# Altium PCB IoT-Button-PCB-v1.3.PcbDoc (part 1 of 2)
Units mil, origin at the board's own origin, x right, y up, seen from the top; angles counter-clockwise.
Board outline 3543.3 x 3267.72 mil, 2 copper layers (Top Layer, Bottom Layer), stack 61.811 mil thick; 61 components, 28 nets, 224 pads, 60 vias.
Unrouted connection lines stored in the file: 71.
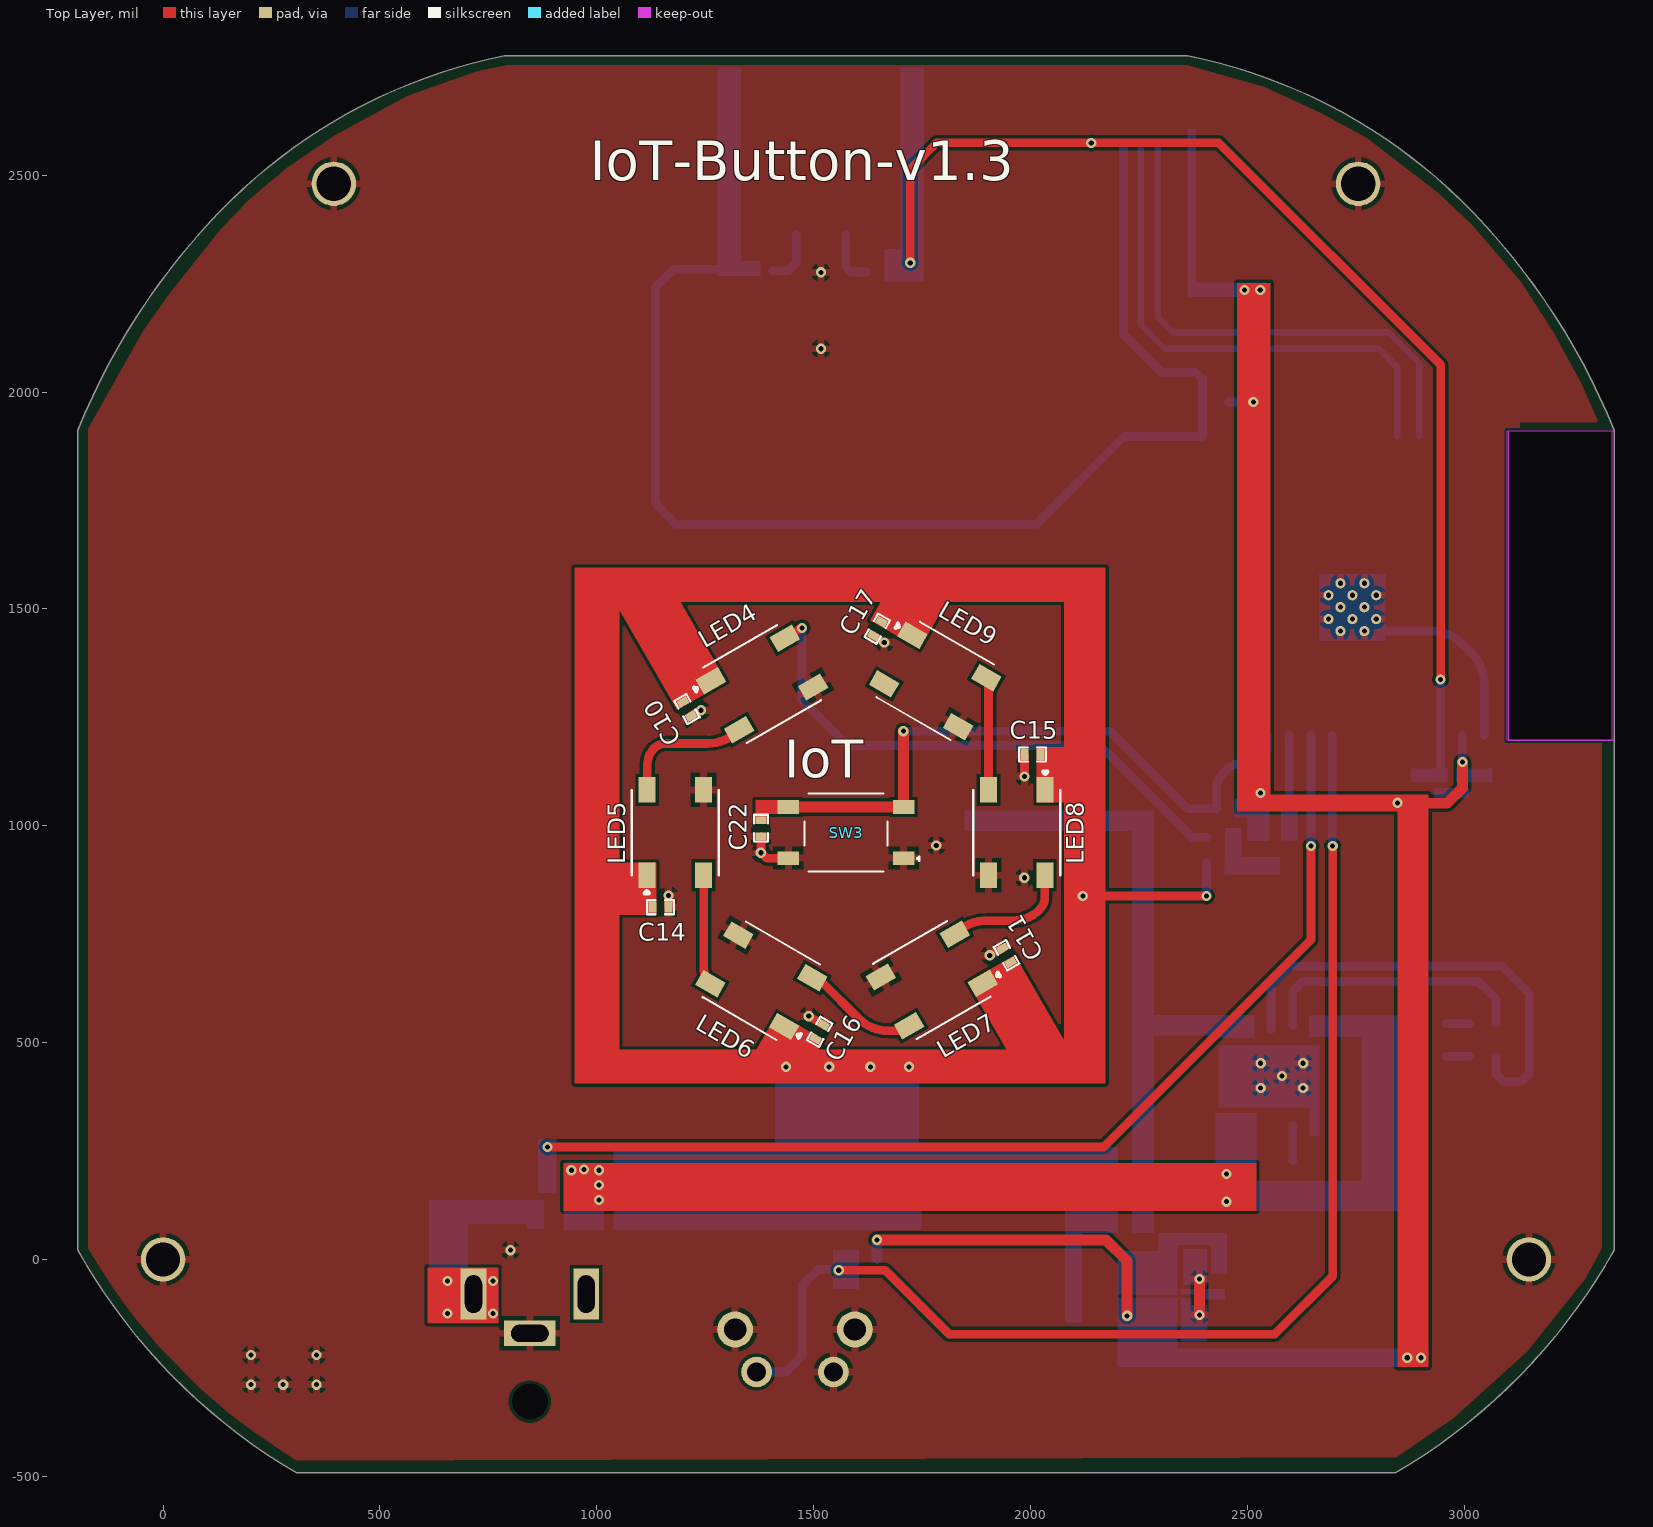
[diagram p0: Top Layer view]
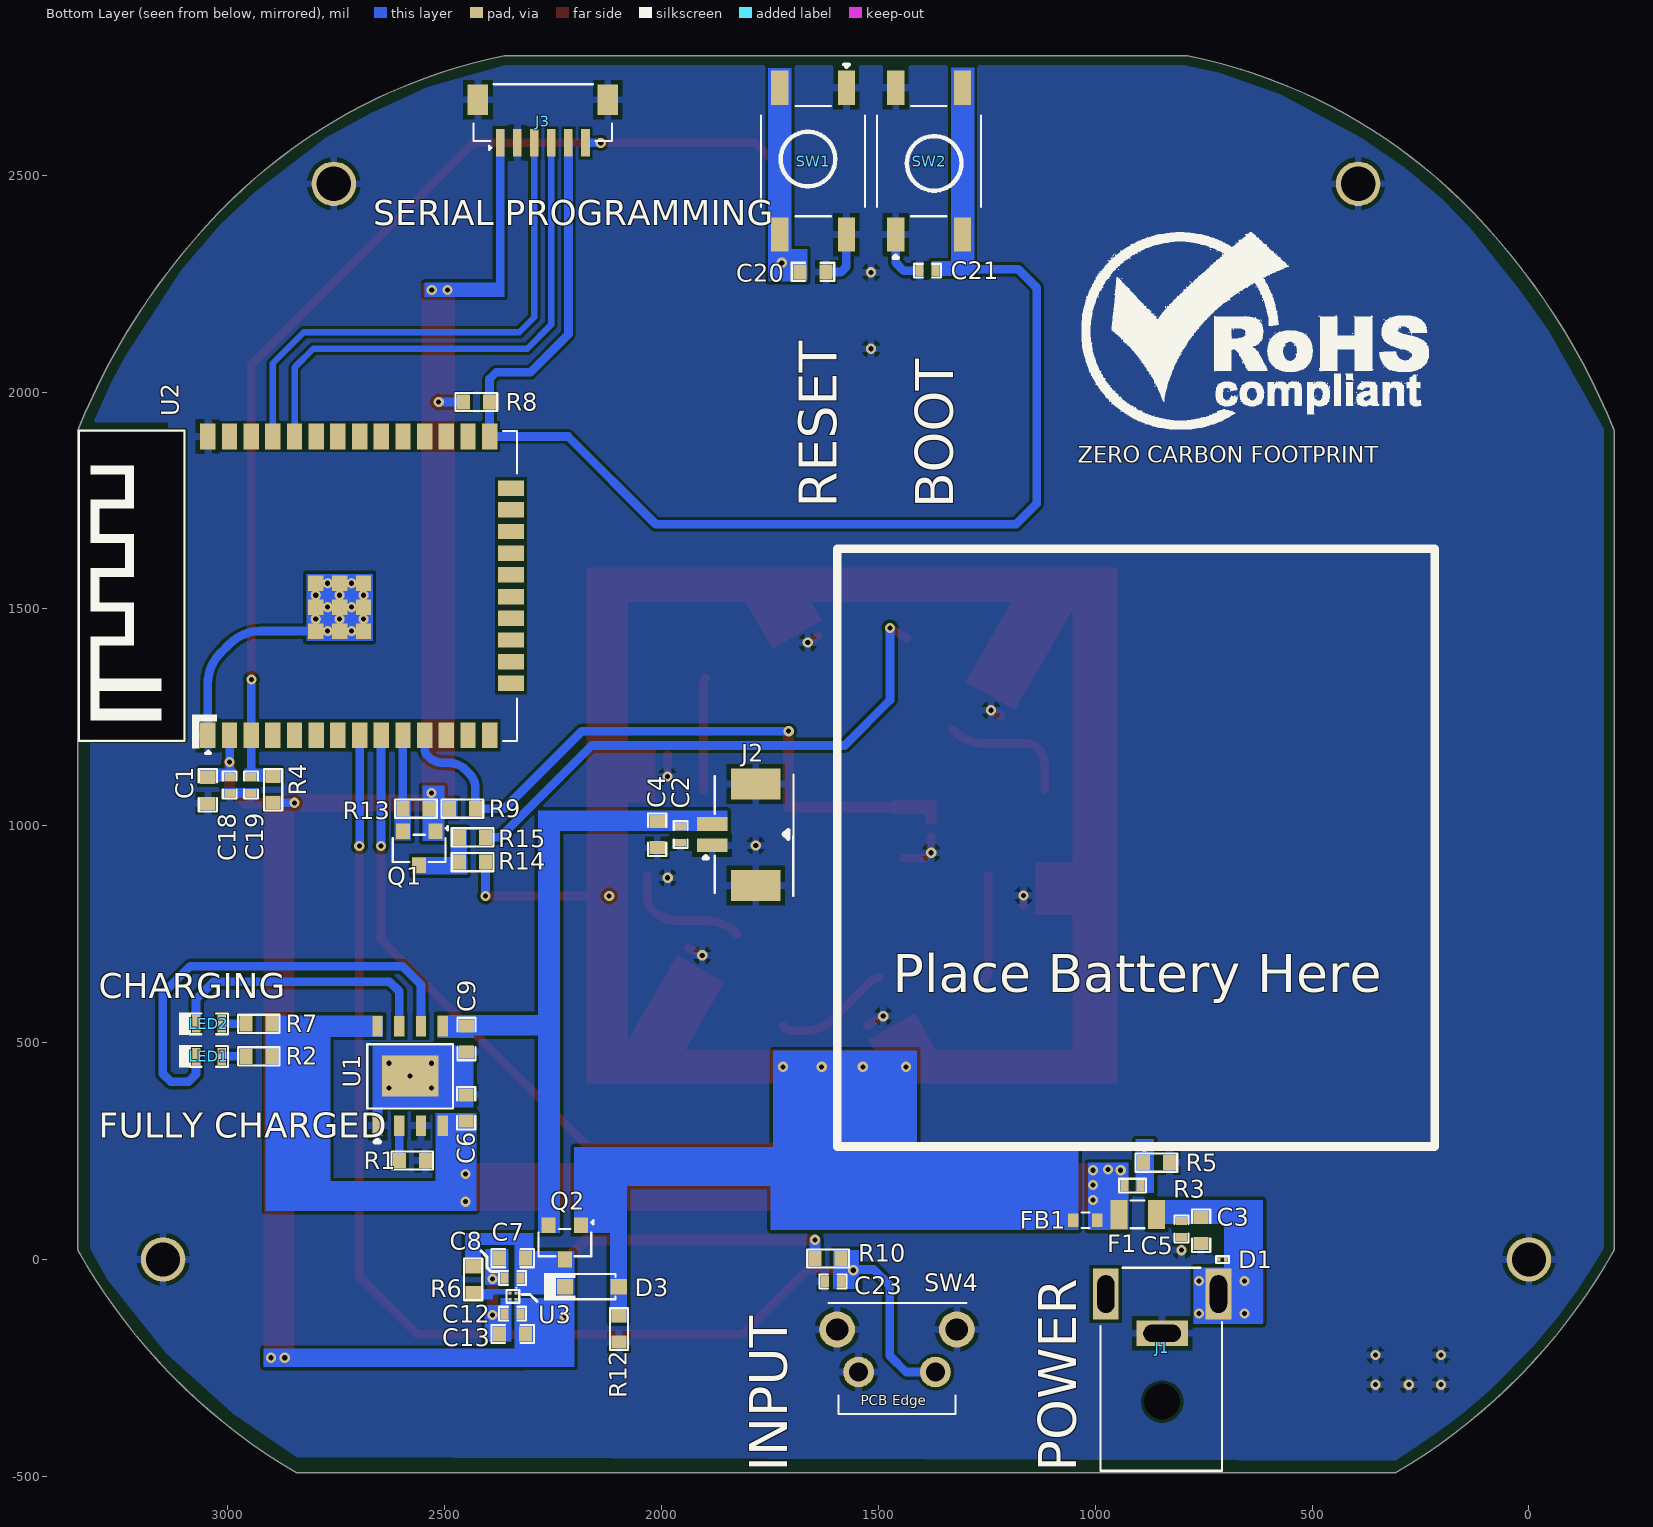
[diagram p1: Bottom Layer view, seen from below]
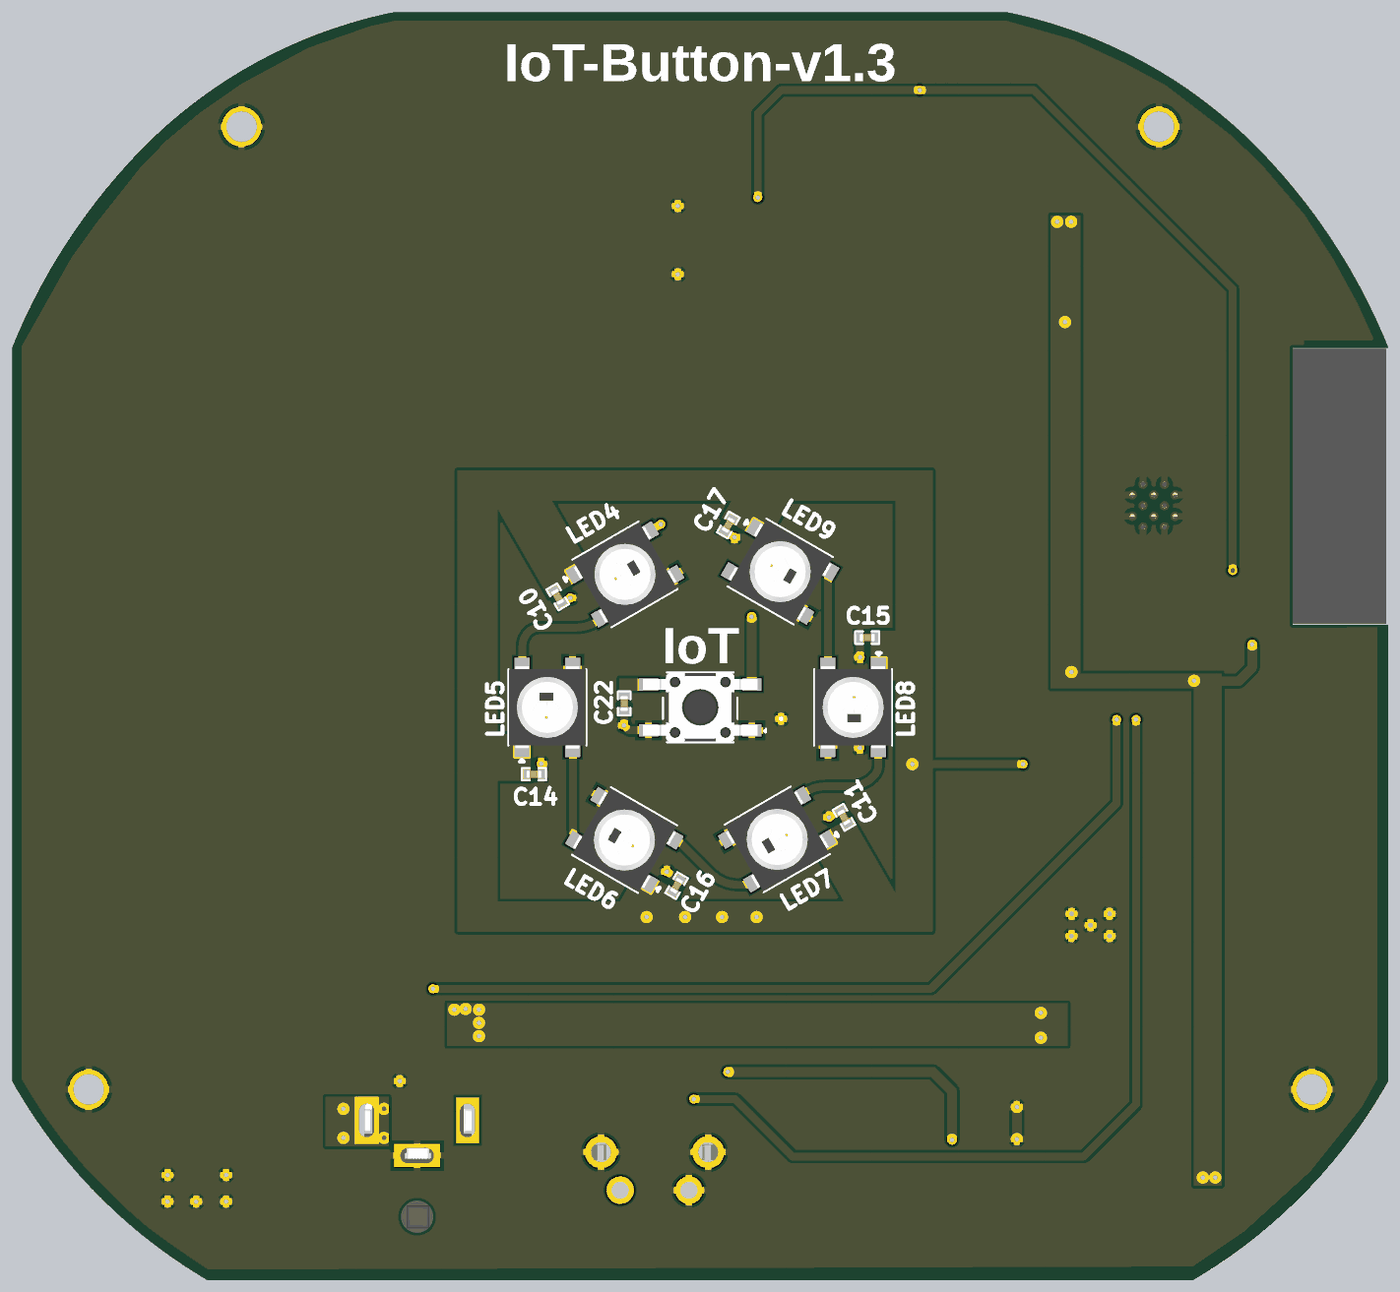
[diagram p2: 3D render of the assembled board from above, using the file's embedded part models]
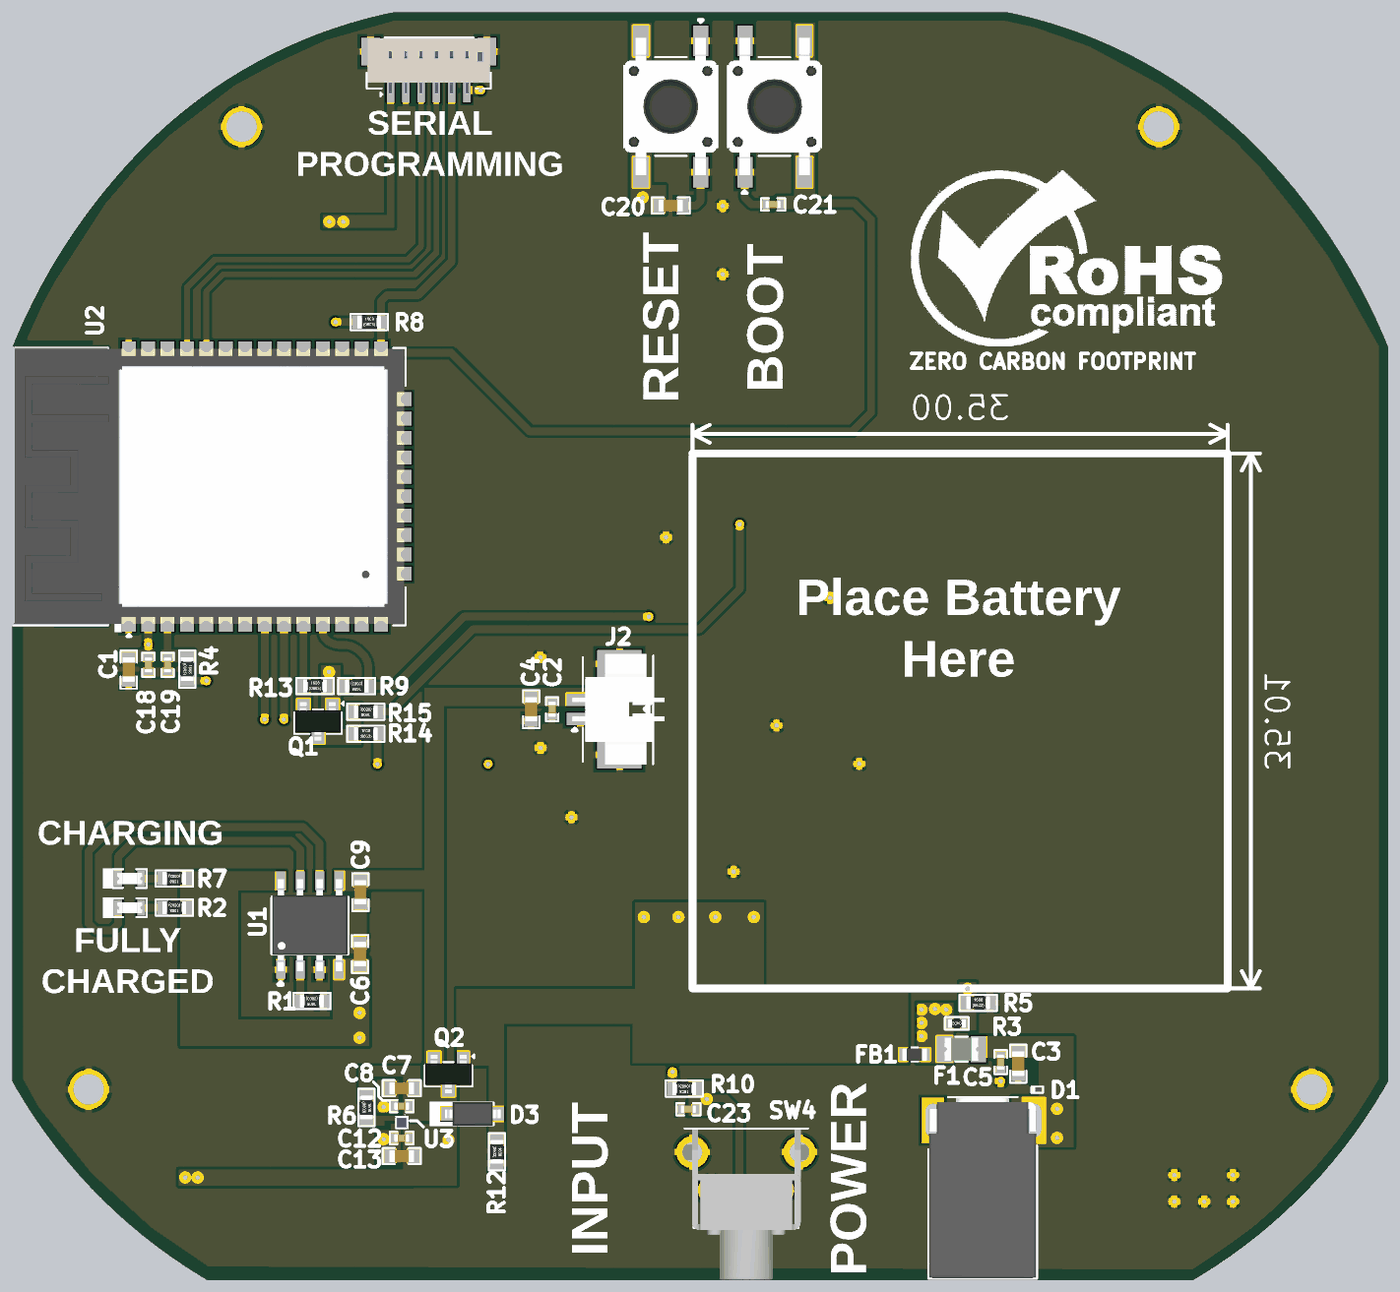
[diagram p3: 3D render of the assembled board from below, using the file's embedded part models]

## Layer stack, top to bottom
Top Solder: solder mask 0.3937, Solder Resist, Dk 3.5
Top Layer: signal copper 1.378
Dielectric 1: dielectric 59.0551, FR-4, Dk 4.8
Bottom Layer: signal copper 1.378
Bottom Solder: solder mask 0.3937, Solder Resist, Dk 3.5

## Board outline
307.28,-492.13 cw(c1004.42,696.47) -196.85,21.41 -196.85,1911.17 cw(c1263.78,1322.48) 127.96,2413.3 cw(c1036.62,1540.64) 787.4,2775.59 2362.2,2775.59 cw(c2112.99,1540.64) 3021.65,2413.3 cw(c1885.82,1322.48) 3346.45,1911.17 3346.46,21.41 cw(c2145.19,696.47) 2842.32,-492.13
cut-out: 3100,1196.74 3100,1910.74 3346.46,1911.17 3346.46,1197.27

## Design rules (kind name [scope] priority, off if disabled: settings)
Clearance [All] p1: gap=7 ignorepadtopadclearanceinfootprint=FALSE
HoleToHoleClearance [All] p1: gap=5 allowstackedmicrovias=TRUE
MinimumSolderMaskSliver [All] p1: minsoldermaskwidth=0
PolygonConnect [All] p1: connectstyle=Relief reliefconductorwidth=17 reliefentries=4 polygonreliefangle="90 Angle" airgapwidth=10
RoutingVias [All] p1: holewidth=11.81 width=23.62 viastyle="Through Hole" minholewidth=11.81 minwidth=23.62 maxholewidth=11.81 maxwidth=23.62
SilkToSilkClearance [All] p1: silktosilkclearance=2
SilkToSolderMaskClearance [IsPad] p1: minsilkscreentomaskgap=0 clearancetoexposedcopper=TRUE
SolderMaskExpansion [All] p1: expansion=4 istentingtop=FALSE
UnRoutedNet [All] p1: checkbadconnections=TRUE
Width [All] p1: maxlimit=47.24 minlimit=10 preferedwidth=20 minimp=50.000000 maximp=50.000000 favimp=50.000000
25 further rules are at their usual default settings.

## Classes and differential pairs
component class U_Power-Section: C2 C3 C4 C5 C6 C7 C8 C9 C12 C13 D1 D3 F1 FB1 J1 J2 LED1 LED2 Q2 R1 R2 R3 R5 R6 R7 R12 U1 U3
component class U_LEDS: C10 C11 C14 C15 C16 C17 LED4 LED5 LED6 LED7 LED8 LED9 Q1 R13 R14 R15
component class U_Controller-Section: C1 C18 C19 C20 C21 C22 C23 J3 R4 R8 R9 R10 SW1 SW2 SW3 SW4 U2

## Components (designator, comment, footprint, x,y, rotation, side; value= is the part's Value field where it differs from the comment)
C1 "1uF" Cap-0603 3046.46,1081.75 r90 bottom locked
C2 "100nF" Cap-0402 1956.15,979.25 r90 bottom locked
C3 "1uF" Cap-0603 755.95,66.25 r90 bottom
C4 "1uF" Cap-0603 2010.15,979.25 r90 bottom locked
C5 "100nF" Cap-0402 801,70.21 r90 bottom
C6 "10uF" Cap-0603 2450.85,348.62 r270 bottom locked
C7 "1uF" Cap-0603 2343.61,2.88 r180 bottom
C8 "100nF" Cap-0402 2343.61,-43 r180 bottom
C9 "10uF" Cap-0603 2450,508 r90 bottom locked
C10 "100nF" Cap-0402 1208,1269.02 r120 top
C11 "100nF" Cap-0402 1945,701 r300 top
C12 "100nF" Cap-0402 2343.61,-125.3 r180 bottom
C13 "1uF" Cap-0603 2343.61,-172 r180 bottom
C14 "100nF" Cap-0402 1146.83,812 r180 top locked
C15 "100nF" Cap-0402 2004.96,1164 r0 top
C16 "100nF" Cap-0402 1514,524.98 r240 top
C17 "100nF" Cap-0402 1647.14,1454.18 r60 top
C18 "100nF" Cap-0402 2996,1094 r90 bottom locked
C19 "100nF" Cap-0402 2946.46,1094 r90 bottom
C20 "1uF" Cap-0603 1651,2277 r180 bottom
C21 "100nF" Cap-0402 1387,2280 r180 bottom
C22 "100nF" Cap-0402 1378.94,994.25 r90 top
C23 "100nF" Cap-0402 1605,-51 r180 bottom
D1 "PESD5V0H1BSFYL" DSN0603-2 706.95,-0.75 r180 bottom locked
D3 "MBR120VLSFT3G" SOD-123 2160.66,-63.07 r0 bottom
F1 "BSMD0805L-200" Fuse-0805 902.11,103.68 r0 bottom locked
FB1 "BLM18SG121TN1D" "IND-0603 (1608 Metric)" 1023,90 r180 bottom
J1 "DC-0360-2.5" DC-0360-2.5 845.7,-170.52 r90 bottom locked
J2 "1.25-2PWB" 1.25-2PWB 1833.15,979.25 r90 bottom locked
J3 "Voltlink Target" "Voltlink Target" 2273.95,2624.25 r180 bottom locked
LED1 "DNP" LED-0603 3044,468 r0 bottom locked
LED2 "RED" LED-0603 3044,543.25 r0 bottom locked
LED4 "WS2812B-XF02/W" WS2812B-XF02/W 1381.02,1326.96 r30 top
LED5 "WS2812B-XF02/W" WS2812B-XF02/W 1181.1,984.25 r90 top locked
LED6 "WS2812B-XF02/W" WS2812B-XF02/W 1379.57,642.37 r150 top
LED7 "WS2812B-XF02/W" WS2812B-XF02/W 1772.94,644.04 r210 top
LED8 "WS2812B-XF02/W" WS2812B-XF02/W 1968.5,984.25 r270 top locked
LED9 "WS2812B-XF02/W" WS2812B-XF02/W 1780.59,1333.95 r330 top
Q1 "Si2302CDS" Sot-23 2559.12,948.13 r0 bottom
Q2 "AO3401" SOT-23 2223.15,39.25 r0 bottom locked
R1 "10K" Res-0603 2574.95,227.95 r180 bottom locked
R2 "DNP" Res-0603 2928.95,468.25 r180 bottom locked
R3 "56k" Res-0402 914,170 r0 bottom value=56kR
R4 "10K" Res-0603 2896,1083 r90 bottom
R5 "100K" Res-0603 859,223 r0 bottom
R6 "10K" Res-0603 2434.5,-46.36 r90 bottom
R7 "330R" Res-0603 2928.95,543.25 r180 bottom locked
R8 "DNP" Res-0603 2427,1977 r0 bottom
R9 "10K" Res-0603 2459.47,1039.25 r180 bottom
R10 "10K" Res-0603 1616,2 r180 bottom locked
R12 "100K" RES-0603 2098.15,-160.75 r90 bottom locked
R13 "10K" Res-0603 2566.72,1039.5 r0 bottom
R14 "10K" Res-0603 2436,916 r0 bottom
R15 "1K" Res-0603 2436,973 r180 bottom
SW1 "K2-6639SP-C4SC-04" K2-6639SP-C4SC-04 1650.77,2532.29 r270 bottom locked
SW2 "K2-6639SP-C4SC-04" K2-6639SP-C4SC-04 1383.23,2532.29 r90 bottom locked
SW3 "GT-TC074E-H080-L1" GT-TC074E-H080-L1 1574.8,984.25 r180 top locked
SW4 "1825027-8" 1825027-8 1457.2,-210.75 r180 bottom locked
U1 "TP4056-42-ESOP8" ESOP-8 2579.95,423.05 r90 bottom locked
U2 "ESP32-WROOM-32E-N8R2" "38-SMD Module" 2696.85,1553.15 r90 bottom locked
U3 "TPS7A2133PYWDJ" "4-WCSP (0.63x0.63)" 2343.61,-85.79 r270 bottom

## Footprints (in the part's own frame and the unit in brackets; to place one, negate y for a bottom-side part, rotate by r counter-clockwise, add the part's x,y. Pads: shape width x height; smd on the part's side, far side on the other; paste and mask are expansions set on the pad)
1.25-2PWB [mm]
  rect 0.8x1.8 smd: 1(-0.625,1.275) 2(0.625,1.275)
  rect 1.8x2.9 smd: MP1(-2.975,-1.275) MP2(2.975,-1.275)
  silkscreen extent -3.6,-3.48 3.52,1.78, body extent -3.62,-4.24 3.62,1.81, height 3.5
"4-WCSP (0.63x0.63)" [mm]
  rect 0.165x0.165 smd: A1(-0.192,0.193) A2(0.158,0.193) B1(-0.192,-0.157) B2(0.158,-0.157)
  silkscreen extent -0.54,-0.37 0.36,0.39, body extent -0.32,-0.32 0.32,0.32, height 0.43
"38-SMD Module" [mm]
  rect 1.5x0.9 smd: 1(-8.75,8.88) 2(-8.75,7.61) 3(-8.75,6.34) 4(-8.75,5.07) 5(-8.75,3.8) 6(-8.75,2.53) 7(-8.75,1.26) 8(-8.75,-0.01) 9(-8.75,-1.28) 10(-8.75,-2.55) 11(-8.75,-3.82) 12(-8.75,-5.09) 13(-8.75,-6.36) 14(-8.75,-7.63) 25(8.75,-7.63) 26(8.75,-6.36) 27(8.75,-5.09) 28(8.75,-3.82) 29(8.75,-2.55) 30(8.75,-1.28) 31(8.75,-0.01) 32(8.75,1.26) 33(8.75,2.53) 34(8.75,3.8) 35(8.75,5.07) 36(8.75,6.34) 37(8.75,7.61) 38(8.75,8.88)
  rect 0.9x1.5 smd: 15(-5.71,-8.88) 16(-4.44,-8.88) 17(-3.17,-8.88) 18(-1.9,-8.88) 19(-0.63,-8.88) 20(0.64,-8.88) 21(1.91,-8.88) 22(3.18,-8.88) 23(4.45,-8.88) 24(5.72,-8.88)
  rect 0.9x0.9 smd: 39(-2.65,2.56) 40(-1.25,2.56) 41(0.15,2.56) 42(-2.65,1.16) 43(-1.25,1.16) 44(0.15,1.16) 45(-2.65,-0.24) 46(-1.25,-0.24) 47(0.15,-0.24)
  round 0.6 hole 0.3 mask+0: 39_10(-1.95,2.56) 39_11(-0.55,2.56) 39_12(-2.65,1.86) 39_13(-1.25,1.86) 39_14(0.15,1.86) 39_15(-1.95,1.16) 39_16(-0.55,1.16) 39_17(-2.65,0.46) 39_18(-1.25,0.46) 39_19(0.15,0.46) 39_20(-1.95,-0.24) 39_21(-0.55,-0.24)
  Keep-Out Layer region: -9.043,16.383 9.042,16.383 9.042,10.287 -9.043,10.287
  silkscreen extent -9.8,-9.22 9.09,16.43, body extent -9,-9.12 9,16.38, height 3.25
1825027-8 [mm]
  round 1.8 hole 1.1: 1(-2.25,-1.245) 2(2.25,-1.245)
  round 2.1 hole 1.3: 3(3.505,1.245) 4(-3.505,1.245)
  silkscreen extent -4.01,-3.71 4.06,2.79, body extent -4.18,-7.11 4.23,2.73, height 8
Cap-0402 [mil]
  rect 18x25 smd mask+2.36: 1(-18.5,0) 2(18.5,0)
  silkscreen extent -31,-16 31,16, body extent -20,-10 20,10, height 19
Cap-0603 [mil]
  rect 30x35 smd mask+2.36: 1(-30,0) 2(30,0)
  silkscreen extent -49,-21 49,21, body extent -32,-16 31,16, height 34
DC-0360-2.5 [mm]
  rect 1.5x3 hole 1 slot 2.2 at 90 deg mask+0.05: 2(0,0)
  rect 3x1.5 hole 1 slot 2.2 at 0 deg mask+0.05: 3(2.3,3.3) 4(2.3,-3.3)
  round 0 hole 2.1 unplated mask+0.05: MH(-4,0)
  silkscreen extent -8.05,-3.51 3.84,3.61, body extent -8.01,-3.45 3.79,3.56, height 9.65
DSN0603-2 [mm]
  rect 0.2x0.24 smd mask+0.055: 1(-0.2,0) 2(0.2,0)
  silkscreen extent -0.38,-0.2 0.38,0.2, body extent -0.3,-0.15 0.3,0.15, height 0.32
ESOP-8 [mm]
  rect 1.2x0.6 smd: 1(-2.909,1.905) 2(-2.909,0.635) 3(-2.909,-0.635) 4(-2.909,-1.905) 5(2.909,-1.905) 6(2.909,-0.635) 7(2.909,0.635) 8(2.909,1.905)
  rect 2.4x3.3 smd: 9(0,0)
  silkscreen extent -3.88,-2.51 1.85,2.51, body extent -3,-2.45 3,2.45, height 1.75
Fuse-0805 [mm]
  rect 1x1.7 smd: 1(-1.1,0) 2(1.1,0)
  silkscreen extent -0.41,-0.81 0.41,0.81, body extent -1.1,-0.75 1.1,0.75, height 1.24
GT-TC074E-H080-L1 [mm]
  rect 1.25x0.8 smd: 1(-3.375,1.5) 2(3.375,1.5) 3(-3.375,-1.5) 4(3.375,-1.5)
  silkscreen extent -4.29,-2.29 2.44,2.29, body extent -3.75,-2.25 3.75,2.25, height 8
"IND-0603 (1608 Metric)" [mm] "0.063\" L x 0.032\" W (1.60mm x 0.80mm)"
  rect 0.6x0.8 smd: 1(-0.7,0) 2(0.7,0)
  silkscreen extent -0.2,-0.46 0.23,0.46, body extent -0.8,-0.4 0.8,0.4, height 0.78
K2-6639SP-C4SC-04 [mm]
  rect 2x1 smd: 1(-4.3,1.95) 2(4.3,1.95) 3(-4.3,-1.95) 4(4.3,-1.95)
  silkscreen extent -5.66,-3.05 3.23,3.05, body extent -4.5,-3 4.5,3, height 5
LED-0603 [mm]
  rect 0.5x1 smd: 1(-0.75,0) 2(0.75,0)
  silkscreen extent -1.12,-0.66 1.75,0.66, body extent -0.82,-0.37 0.82,0.36, height 0.68
Res-0402 [mil]
  rect 18x25 smd mask+2.17: 1(-18.5,0) 2(18.5,0)
  silkscreen extent -32,-17 32,16, body extent -23,-11 23,11, height 16
Res-0603 [mil]
  rect 30x35 smd: 1(-30,0) 2(30,0)
  silkscreen extent -48,-21 48,21, body extent -31,-17 31,17, height 18
RES-0603 [mil]
  rect 30x35 smd: 1(-30,0) 2(30,0)
  silkscreen extent -48,-21 48,21, body extent -31,-17 31,17, height 18
SOD-123 [mm]
  rect 0.95x0.9 smd: 1(-1.575,0) 2(1.575,0)
  silkscreen extent -1.37,-0.8 2.82,0.8, body extent -1.82,-0.77 1.83,0.78, height 1.5
Sot-23 [mm] "TRANS NPN 40V 0.6A SOT23"
  rect 0.82x0.92 smd: 1(-0.95,-1) 2(0.95,-1) 3(0,1)
  silkscreen extent -1.68,-1.3 1.55,0.81, body extent -1.5,-1.25 1.5,1.25, height 1.05
SOT-23 [mm] "TRANS NPN 40V 0.6A SOT23"
  rect 0.82x0.92 smd: 1(-0.95,-1) 2(0.95,-1) 3(0,1)
  silkscreen extent -1.68,-1.3 1.55,0.81, body extent -1.5,-1.25 1.5,1.25, height 1.05
"Voltlink Target" [mm]
  rect 0.5x1.6 smd: 1(-2.5,-1.262) 2(-1.5,-1.262) 3(-0.5,-1.262) 4(0.5,-1.262) 5(1.5,-1.262) 6(2.5,-1.262)
  rect 1.2x1.8 smd: MP1(-3.8,1.262) MP2(3.8,1.262)
  silkscreen extent -4.06,-1.68 4.06,2.17, body extent -4,-1.49 4,2.11, height 4.25
WS2812B-XF02/W [mm]
  rect 1.5x1 smd: 1(-2.5,1.65) 2(-2.5,-1.65) 3(2.5,-1.65) 4(2.5,1.65)
  silkscreen extent -3.56,-2.55 2.5,2.55, body extent -2.7,-2.5 2.7,2.5, height 1.55

## Part data
C1 C3 C4 C7 C13 C20: library part CC0603KRX5R8BB105, "CAP CER 1UF 25V X5R 0603", Case Code (Imperial)=0603, Case Code (Metric)=1608, Dielectric=X5R, LCSC Part Number=C14664, Manufacturer=Yageo, Max Operating Temperature=85°C, Min Operating Temperature=-55°C, Package Quantity=1, Supplier Part Number 1=311-1445-1-ND, Tolerance=10%, Voltage Rating=25V, Capacitance=1uF, Case/Package=0603, Category="Ceramic Capacitors", ComponentLink1Description=https://datasheet.ciiva.com/176/mlccorderingcode-176785.pdf?src-supplier=Digi-Key, ComponentLink1URL=https://datasheet.ciiva.com/176/mlccorderingcode-176785.pdf?src-supplier=Digi-Key, ComponentLink2Description=https://datasheet.ciiva.com/176/mlccorderingcode-176786.pdf?src-supplier=Digi-Key, ComponentLink2URL=https://datasheet.ciiva.com/176/mlccorderingcode-176786.pdf?src-supplier=Digi-Key, ComponentLink3Description=https://datasheet.ciiva.com/176/mlccorderingcode-176787.pdf?src-supplier=Digi-Key, ComponentLink3URL=https://datasheet.ciiva.com/176/mlccorderingcode-176787.pdf?src-supplier=Digi-Key, ComponentLink4Description=https://datasheet.ciiva.com/17436/upy-gphc-x5r-4v-to-50v-12-17436952.pdf?src-supplier=Avnet+Europe, ComponentLink4URL=https://datasheet.ciiva.com/17436/upy-gphc-x5r-4v-to-50v-12-17436952.pdf?src-supplier=Avnet+Europe, ComponentLink5Description=https://datasheet.ciiva.com/7978/1525783-7978171.pdf?src-supplier=Element14, ComponentLink5URL=https://datasheet.ciiva.com/7978/1525783-7978171.pdf?src-supplier=Element14, ComponentLink6Description=https://datasheet.ciiva.com/11586/upy-gphc-x5r-4v-to-50v-12-11586318.pdf?src-supplier=Avnet, ComponentLink6URL=https://datasheet.ciiva.com/11586/upy-gphc-x5r-4v-to-50v-12-11586318.pdf?src-supplier=Avnet, Construction=Flat, Depth=0.8mm, Halogen Free="Halogen Free", Height=0.8mm, Lead Free="Lead Free", Length=1.6mm, Manufacturer Part Number=CC0603KRX5R8BB105, Mount="Surface Mount", Number of Pins=2, Packaging="Tape and Reel", Pricing 1="1=0.12000, 10=0.08400, 50=0.04760, 100=0.03940, 500=0.02764, 1000=0.02288 (USD)", Radiation Hardening=No, REACH SVHC="No SVHC", RoHS=Yes, RoHS Compliant=Yes, Series=CC, Stock 1=919939, Supplier 1=Digi-Key, Termination=SMD/SMT, Thickness=0.035inch, Voltage Rating (DC)=25V, Width=0.031inch
  C3 C4 C7 C13: Item Type=Capacitor
C2 C5 C8 C10 C11 C12 C14 C15 C16 C17 C18 C19 C21 C22 C23: library part CC0402KRX5R8BB104, "CAP CER 0.1UF 25V X5R 0402", Case Code (Imperial)=0402, Case Code (Metric)=1005, Dielectric=X5R, LCSC Part Number=C106256, Manufacturer=Yageo, Max Operating Temperature=85°C, Min Operating Temperature=-55°C, Resistor Type=Ceramic, Supplier Part Number 1=311-1697-1-ND, Tolerance=10%, Voltage Rating=25V, Capacitance=100nF, Case/Package=0402, Category="Ceramic Capacitors", ComponentLink1Description=http://www.mouser.com/ds/2/447/UPY-GPHC_X5R_4V-to-50V_25-1131599.pdf?src-supplier=Mouser, ComponentLink1URL=http://www.mouser.com/ds/2/447/UPY-GPHC_X5R_4V-to-50V_25-1131599.pdf?src-supplier=Mouser, ComponentLink2Description=http://www.yageo.com/documents/recent/UPY-GPHC_X5R_4V-to-50V-16.pdf?src-supplier=Future+Electronics, ComponentLink2URL=http://www.yageo.com/documents/recent/UPY-GPHC_X5R_4V-to-50V-16.pdf?src-supplier=Future+Electronics, ComponentLink3Description=http://www.yageo.com/documents/recent/UPY-GPHC_X5R_4V-to-50V_25.pdf?src-supplier=Digi-Key, ComponentLink3URL=http://www.yageo.com/documents/recent/UPY-GPHC_X5R_4V-to-50V_25.pdf?src-supplier=Digi-Key, Depth=0.5mm, Halogen Free="Halogen Free", Item Type=Capacitor, Lead Free="Lead Free", Length=0.039inch, Manufacturer Part Number=CC0402KRX5R8BB104, Mount="Surface Mount", Packaging="Tape and Reel", Pricing 1="1=0.10000, 10=0.03800, 50=0.02100, 100=0.01710, 500=0.01224, 1000=0.00961, 2500=0.00874, 5000=0.00804 (USD)", RoHS=Yes, RoHS Compliant=Yes, Series=CC, Stock 1=4598218, Supplier 1=Digi-Key, Thickness=0.022inch, Voltage Rating (DC)=25V, Width=0.02inch
C6 C9: library part CC0603KRX5R7BB106, "CAP CER 10UF 16V X5R 0603", Case Code (Imperial)=0603, Case Code (Metric)=1608, LCSC Part Number=C2936601, Manufacturer=Yageo, Max Operating Temperature=85°C, Min Operating Temperature=-55°C, Supplier Part Number 1=311-3486-1-ND, Tolerance=10%, Voltage Rating=16V, Capacitance=10uF, Case/Package=0603, Category="Ceramic Capacitors", ComponentLink1Description=http://www.yageo.com/documents/recent/UPY-GPHC_X5R_4V-to-50V_25.pdf?src-supplier=Digi-Key, ComponentLink1URL=http://www.yageo.com/documents/recent/UPY-GPHC_X5R_4V-to-50V_25.pdf?src-supplier=Digi-Key, Item Type=Capacitor, Manufacturer Part Number=CC0603KRX5R7BB106, Mount="Surface Mount", Packaging="Cut Tape", Pricing 1="1=0.68000, 10=0.48000, 50=0.36300, 100=0.31610, 500=0.23416, 1000=0.19903 (USD)", RoHS=Yes, RoHS Compliant=Yes, Stock 1=240725, Supplier 1=Digi-Key
D1: "TVS DIODE 5VWM 6.3VC DSN0603-2", LCSC Part Number=C477989, Manufacturer=Nexperia, Category="ESD and Circuit Protection ICs", ComponentLink1Description=http://www.farnell.com/datasheets/1961312.pdf?src-supplier=Farnell, ComponentLink1URL=http://www.farnell.com/datasheets/1961312.pdf?src-supplier=Farnell, ComponentLink2Description=https://assets.nexperia.com/documents/data-sheet/PESD5V0H1BSF.pdf?src-supplier=Digi-Key, ComponentLink2URL=https://assets.nexperia.com/documents/data-sheet/PESD5V0H1BSF.pdf?src-supplier=Digi-Key, ComponentLink3Description=http://www.farnell.com/datasheets/1961312.pdf?src-supplier=Newark, ComponentLink3URL=http://www.farnell.com/datasheets/1961312.pdf?src-supplier=Newark, Item Type=Diode, Manufacturer Part Number=PESD5V0H1BSFYL, Pricing 1="18000=0.06453, 36000=0.06278, 54000=0.06104, 90000=0.05930, 180000=0.05755, 900000=0.05581, 1800000=0.05406 (USD)", RoHS=Yes, RoHS Compliant=Yes, Stock 1=9000, Supplier 1=Avnet, Supplier Part Number 1=PESD5V0H1BSFYL
D3: "DIODE SCHOTTKY 20V 1A SOD123FL", Average Rectified Current=1A, Forward Voltage=340mV, LCSC Part Number=C295749, Manufacturer="ON Semiconductor", Max Forward Surge Current (Ifsm)=45A, Max Operating Temperature=125°C, Max Repetitive Reverse Voltage (Vrrm)=20V, Max Reverse Leakage Current=600uA, Min Operating Temperature=-65°C, Package Quantity=10000, Supplier Part Number 1=MBR120VLSFT3GOSCT-ND, ComponentLink1Description=http://www.mouser.com/ds/2/308/MBR120VLSFT1-D-107081.pdf?src-supplier=Mouser, ComponentLink1URL=http://www.mouser.com/ds/2/308/MBR120VLSFT1-D-107081.pdf?src-supplier=Mouser, ComponentLink2Description=http://www.onsemi.com/pub/Collateral/MBR120VLSFT1-D.PDF?src-supplier=Digi-Key, ComponentLink2URL=http://www.onsemi.com/pub/Collateral/MBR120VLSFT1-D.PDF?src-supplier=Digi-Key, ComponentLink3Description=http://www.onsemi.cn/pub_link/Collateral/MBR120VLSFT1-D.PDF?src-supplier=Avnet, ComponentLink3URL=http://www.onsemi.cn/pub_link/Collateral/MBR120VLSFT1-D.PDF?src-supplier=Avnet, Current Rating=1A, Element Configuration=Single, Forward Current=1A, Halogen Free="Halogen Free", Lead Free="Lead Free", Manufacturer Part Number=MBR120VLSFT3G, Max Reverse Voltage (DC)=20V, Max Surge Current=45A, Number of Pins=2, Output Current=1A, Packaging="Tape and Reel", Peak Non-Repetitive Surge Current=45A, Peak Reverse Current=600uA, Polarity=Standard, Pricing 1="1=0.42, 10=0.338, 100=0.2298, 500=0.17234, 1000=0.12926 (USD)", Radiation Hardening=No, REACH SVHC="No SVHC", Stock 1=130499, Supplier 1=Digi-Key, Voltage Rating (DC)=20V
F1: "6V 2A 50A 1W -40℃~+85℃ 4A 4mΩ 5s 45mΩ 0805 Resettable Fuses ROHS", LCSC Part Number=C2757931, Manufacturer=BHFUSE, Package=0805, ComponentLink1Description=LCSC, ComponentLink1URL=https://www.lcsc.com/product-detail/Resettable-Fuses_BHFUSE-BSMD0805L-200_C2757931.html, Item Type=Fuse, Manufacturer Part Number=BSMD0805L-200
FB1: "FERRITE BEAD 120 OHM 0603 1LN", Case Code (Imperial)=0603, Case Code (Metric)=1608, Current Rating=3A, DC Resistance (DCR)=25mR, Frequency=100MHz, LCSC Part Number=C113030, Manufacturer=Murata, Max Operating Temperature=125°C, Min Operating Temperature=-55°C, Package Quantity=1, Tolerance=25%, Case/Package=0603, Category="Ferrite Beads and Chips", ComponentLink1Description=https://datasheet.ciiva.com/1012/l0110s0100blm18s-1012624.pdf?src-supplier=Digi-Key, ComponentLink1URL=https://datasheet.ciiva.com/1012/l0110s0100blm18s-1012624.pdf?src-supplier=Digi-Key, ComponentLink2Description=https://datasheet.ciiva.com/11799/0900766b811b5866-11799181.pdf?src-supplier=RSComponents, ComponentLink2URL=https://datasheet.ciiva.com/11799/0900766b811b5866-11799181.pdf?src-supplier=RSComponents, ComponentLink3Description=https://datasheet.ciiva.com/18093/getdatasheetpartid-295885-18093249.pdf?src-supplier=Verical, ComponentLink3URL=https://datasheet.ciiva.com/18093/getdatasheetpartid-295885-18093249.pdf?src-supplier=Verical, ComponentLink4Description=https://datasheet.ciiva.com/41449/001171723-da-01-en-chip-drossel0603-120r-3000ma-1-6x0-8mm-41449353.pdf?src-supplier=Conrad, ComponentLink4URL=https://datasheet.ciiva.com/41449/001171723-da-01-en-chip-drossel0603-120r-3000ma-1-6x0-8mm-41449353.pdf?src-supplier=Conrad, ComponentLink5Description=https://datasheet.ciiva.com/41449/001172312-da-01-en-drossel-0603-120r-1-6x0-8mm-10000st-41449675.pdf?src-supplier=Conrad, ComponentLink5URL=https://datasheet.ciiva.com/41449/001172312-da-01-en-drossel-0603-120r-1-6x0-8mm-10000st-41449675.pdf?src-supplier=Conrad, ComponentLink6Description=https://datasheet.ciiva.com/8021/5151-8021511.pdf?src-supplier=Element14, ComponentLink6URL=https://datasheet.ciiva.com/8021/5151-8021511.pdf?src-supplier=Element14, ComponentLink7Description=https://datasheet.ciiva.com/8021/5151-8021512.pdf?src-supplier=Element14, ComponentLink7URL=https://datasheet.ciiva.com/8021/5151-8021512.pdf?src-supplier=Element14, ComponentLink8Description=https://datasheet.ciiva.com/14122/blm-series-eng-tds-14122906.pdf?src-supplier=Distrelec, ComponentLink8URL=https://datasheet.ciiva.com/14122/blm-series-eng-tds-14122906.pdf?src-supplier=Distrelec, ComponentLink9Description=https://datasheet.ciiva.com/1012/l0110s0100blm18s-1012623.pdf?src-supplier=Digi-Key, ComponentLink9URL=https://datasheet.ciiva.com/1012/l0110s0100blm18s-1012623.pdf?src-supplier=Digi-Key, ComponentLink10Description=https://datasheet.ciiva.com/1012/l0110s0100blm18s-1012625.pdf?src-supplier=Digi-Key, ComponentLink10URL=https://datasheet.ciiva.com/1012/l0110s0100blm18s-1012625.pdf?src-supplier=Digi-Key, ComponentLink11Description=https://datasheet.ciiva.com/16395/l0110s0100blm18s-16395498.pdf?src-supplier=Future+Electronics, ComponentLink11URL=https://datasheet.ciiva.com/16395/l0110s0100blm18s-16395498.pdf?src-supplier=Future+Electronics, Core Material=Ferrite, DC Resistance-Max=25mR, Depth=0.8mm, Height=0.8mm, Impedance=120R, Item Type="Ferrite Bead", Lead Free="Lead Free", Length=1.6mm, Manufacturer Part Number=BLM18SG121TN1D, Material=Steel,Ferrite, Max Current Rating=3A, Max DC Current=3A, Number of Circuits=1, Number of Lines=1, Number of Pins=2, Packaging="Tape and Reel", Pricing 1="1=0.12640, 10=0.08350, 25=0.07210, 100=0.05150, 250=0.04730, 500=0.04110, 1000=0.03420, 3000=0.03360, 6000=0.03320, 15000=0.03270, 30000=0.03200, 75000=0.03150 (USD)", Reach SVHC Compliant=Yes, RoHS=Yes, RoHS Compliant=Yes, Series=BLM18S, Shielding=Unshielded, Stock 1=82612, Supplier 1="Arrow Electronics", Supplier Part Number 1=BLM18SG121TN1D, Termination=SMD/SMT, Test Frequency=100MHz, Width=0.8mm
J1: "DC Power Receptacle 260℃ Brass -20℃~+70℃ 2.5mm 6mm 2.5A 24V Plugin AC/DC Power Connectors ROHS", LCSC Part Number=C319122, Manufacturer="XKB Connectivity", Package=Plugin, ComponentLink1Description=LCSC, ComponentLink1URL=https://www.lcsc.com/product-detail/AC-DC-Power-Connectors_XKB-Connectivity-DC-0360-2-5_C319122.html, Item Type="DC Jack", Manufacturer Part Number=DC-0360-2.5
J2: "1x2P 1 1.25mm Male pin 2 -40℃~+85℃ Surface Mount SMD,P=1.25mm Wire To Board / Wire To Wire Connector ROHS", LCSC Part Number=C2905009, Manufacturer=DEALON, Package=SMD,P=1.25mm, ComponentLink1Description=LCSC, ComponentLink1URL=https://www.lcsc.com/product-detail/Wire-To-Board-Wire-To-Wire-Connector_DEALON-1-25-2PWB_C2905009.html, Item Type="JST Connector", Manufacturer Part Number=1.25-2PWB
J3: library part C145963, "1x6P SH 1 1mm 6 SMD,P=1mm Wire To Board / Wire To Wire Connector ROHS", Manufacturer=BOOMELE, Package=SMD,P=1mm, ComponentLink1Description=LCSC, ComponentLink1URL=https://www.lcsc.com/product-detail/Wire-To-Board-Wire-To-Wire-Connector_BOOMELE-Boom-Precision-Elec-C145963_C145963.html, Item Type=Connector, LCSC Part Number=C145963, Manufacturer Part Number=C145963
LED1: library part NCD0603G2, "Emerald 0603 Light Emitting Diodes (LED) ROHS", LCSC Part Number=C87326, Manufacturer="Foshan NationStar Optoelectronics", Package=0603, ComponentLink1Description=LCSC, ComponentLink1URL=https://www.lcsc.com/product-detail/Light-Emitting-Diodes-LED_Foshan-NationStar-Optoelectronics-NCD0603G2_C87326.html, Item Type=LED, Manufacturer Part Number=NCD0603G2
LED2: library part NCD0603R3, "0603 Light Emitting Diodes (LED) ROHS", LCSC Part Number=C3151730, Manufacturer="Foshan NationStar Optoelectronics", Package=0603, ComponentLink1Description=LCSC, ComponentLink1URL=https://www.lcsc.com/product-detail/Light-Emitting-Diodes-LED_Foshan-NationStar-Optoelectronics-NCD0603R3_C3151730.html, Item Type=LED, Manufacturer Part Number=NCD0603R3
LED4 LED5 LED6 LED7 LED8 LED9: "SMD5050 Light Emitting Diodes (LED) ROHS", LCSC Part Number=C4154882, Manufacturer=Worldsemi, Package=SMD5050, ComponentLink1Description=LCSC, ComponentLink1URL=https://www.lcsc.com/product-detail/Light-Emitting-Diodes-LED_Worldsemi-WS2812B-XF02-W_C4154882.html, Item Type="RGB LED", Manufacturer Part Number=WS2812B-XF02/W
Q1: "N-CHANNEL 20-V (D-S) MOSFET", LCSC Part Number=C5310968, Manufacturer="TECH PUBLIC", Manufacturer Part Number=SI2302CDS, Package=SOT-23, ComponentLink1Description=LCSC, ComponentLink1URL=https://www.lcsc.com/product-detail/MOSFETs_TECH-PUBLIC-SI2302CDS_C5310968.html, Item Type=Mosfet
Q2: "Trans Mosfet P-ch 30V 4A 3-PIN SOT-23 T/r", Case/Package=TO-236-3, Continuous Drain Current (ID)=4A, Drain to Source Voltage (Vdss)=30V, Input Capacitance=1.2nF, LCSC Part Number=C181091, Manufacturer="Alpha & Omega Semiconductor", Manufacturer Part Number=AO3401A, Max Operating Temperature=150°C, Max Power Dissipation=1.4W, Min Operating Temperature=-55°C, Category=MOSFETs, ComponentLink1Description=https://datasheet.ciiva.com/940/ao3401a-940720.pdf?src-supplier=Digi-Key, ComponentLink1URL=https://datasheet.ciiva.com/940/ao3401a-940720.pdf?src-supplier=Digi-Key, ComponentLink2Description=https://datasheet.ciiva.com/26927/getdatasheetpartid-79048-26927888.pdf?src-supplier=Verical, ComponentLink2URL=https://datasheet.ciiva.com/26927/getdatasheetpartid-79048-26927888.pdf?src-supplier=Verical, Item Type=Mosfet, Lead Free="Lead Free", Mount="Surface Mount", Number of Elements=1, Number of Pins=3, Packaging="Tape and Reel", Power Dissipation=1.4W, Radiation Hardening=No, Rds On Max=44mR, RoHS=Yes, RoHS Compliant=Yes, Series=-, Supplier 1="Arrow Electronics", Supplier Part Number 1=AO3401A
R1 R4 R6 R8 R9 R10 R13 R14: library part RC0603FR-0710KL, "RES SMD 10K Ohm 1% 1/10W 0603", Case Code (Imperial)=0603, Case Code (Metric)=1608, LCSC Part Number=C98220, Manufacturer=Yageo, Max Operating Temperature=155°C, Max Power Dissipation=100mW, Min Operating Temperature=-55°C, Resistance=10kR, Resistance Tolerance=1%, Resistor Type="Thick Film", Supplier Part Number 1=311-10.0KHRCT-ND, Temperature Coefficient=100ppm/°C, Voltage Rating=75V, Voltage Rating (DC)=50V, Case/Package=0603, Category="Chip SMD Resistors", ComponentLink1Description=https://datasheet.ciiva.com/7660/38590-7660789.pdf?src-supplier=Element14, ComponentLink1URL=https://datasheet.ciiva.com/7660/38590-7660789.pdf?src-supplier=Element14, ComponentLink2Description=https://datasheet.ciiva.com/7983/443971-7983596.pdf?src-supplier=Element14, ComponentLink2URL=https://datasheet.ciiva.com/7983/443971-7983596.pdf?src-supplier=Element14, ComponentLink3Description=https://datasheet.ciiva.com/22747/443971-22747519.pdf?src-supplier=Element14, ComponentLink3URL=https://datasheet.ciiva.com/22747/443971-22747519.pdf?src-supplier=Element14, ComponentLink4Description=https://datasheet.ciiva.com/46440/1868787-46440891.pdf?src-supplier=Element14, ComponentLink4URL=https://datasheet.ciiva.com/46440/1868787-46440891.pdf?src-supplier=Element14, ComponentLink5Description=https://datasheet.ciiva.com/7746/1738695-7746239.pdf?src-supplier=Element14, ComponentLink5URL=https://datasheet.ciiva.com/7746/1738695-7746239.pdf?src-supplier=Element14, ComponentLink6Description=https://datasheet.ciiva.com/15189/getdatasheetpartid-409289-15189591.pdf?src-supplier=Verical, ComponentLink6URL=https://datasheet.ciiva.com/15189/getdatasheetpartid-409289-15189591.pdf?src-supplier=Verical, Construction=Rectangular, Depth=0.8mm, Features="Moisture Resistant", Height=0.45mm, Item Type=Resistor, Lead Free="Lead Free", Lead Pitch=0.3mm, Length=1.6mm, Manufacturer Part Number=RC0603FR-0710KL, Military Standard=Not, Number of Pins=2, Number of Terminations=2, Packaging="Tape and Reel", Power Rating=100mW, Pricing 1="1=0.10000, 10=0.02400, 100=0.00970, 1000=0.00436, 2500=0.00378 (USD)", REACH SVHC=Unknown, RoHS=Yes, RoHS Compliant=Yes, Series=RC, Size Code=0603, Stock 1=25249139, Supplier 1=Digi-Key, Termination=SMD/SMT, Tolerance=1%, Weight=7.1E-05oz, Width=0.8mm
R2: library part RC0603FR-07220RL, "RES SMD 220 OHM 1% 1/10W 0603", Case Code (Imperial)=0603, Case Code (Metric)=1608, LCSC Part Number=C107696, Manufacturer=Yageo, Max Operating Temperature=155°C, Max Power Dissipation=100mW, Min Operating Temperature=-55°C, Package Quantity=1, Resistance=220R, Supplier Part Number 1=311-220HRCT-ND, Temperature Coefficient=100ppm/°C, Tolerance=1%, Voltage Rating=50V, Case/Package=0603, ComponentLink1Description=http://www.yageo.com/documents/recent/PYu-RC_Group_51_RoHS_L_10.pdf?src-supplier=Digi-Key, ComponentLink1URL=http://www.yageo.com/documents/recent/PYu-RC_Group_51_RoHS_L_10.pdf?src-supplier=Digi-Key, ComponentLink2Description=http://www.farnell.com/datasheets/1868787.pdf?src-supplier=Element14, ComponentLink2URL=http://www.farnell.com/datasheets/1868787.pdf?src-supplier=Element14, Composition="Thick Film", Depth=0.8mm, Features="Moisture Resistant", Height=0.022inch, Lead Free="Lead Free", Length=1.6mm, Manufacturer Part Number=RC0603FR-07220RL, Military Standard=Not, Number of Pins=2, Number of Terminations=2, Packaging="Tape and Reel", Power Rating=100mW, Pricing 1="1=0.1, 10=0.023, 100=0.0094, 1000=0.00421, 2500=0.00366 (USD)", REACH SVHC="No SVHC", Stock 1=5843995, Supplier 1=Digi-Key, Termination=SMD/SMT, Voltage Rating (DC)=50V, Width=0.031inch
R3: library part RC0402FR-0756KL, "RES 56K OHM 1% 1/16W 0402", Case Code (Imperial)=0402, Case Code (Metric)=1005, LCSC Part Number=C114756, Manufacturer=Yageo, Max Operating Temperature=155°C, Max Power Dissipation=63mW, Min Operating Temperature=-55°C, Package Quantity=1, Power Rating=62.5mW, Resistance Tolerance=1%, Resistor Type="Thick Film", Supplier Part Number 1=3873767, Temperature Coefficient=100ppm/°C, Voltage Rating=50V, Case/Package=0402, Category="Chip SMD Resistors", ComponentLink1Description=https://datasheet.ciiva.com/46412/1018594-46412840.pdf?src-supplier=Element14, ComponentLink1URL=https://datasheet.ciiva.com/46412/1018594-46412840.pdf?src-supplier=Element14, ComponentLink2Description=https://datasheet.ciiva.com/2453/pyu-r-int-thick-7-2453479.pdf?src-supplier=Digi-Key, ComponentLink2URL=https://datasheet.ciiva.com/2453/pyu-r-int-thick-7-2453479.pdf?src-supplier=Digi-Key, ComponentLink3Description=https://datasheet.ciiva.com/2453/pyu-r-int-thick-7-2453480.pdf?src-supplier=Digi-Key, ComponentLink3URL=https://datasheet.ciiva.com/2453/pyu-r-int-thick-7-2453480.pdf?src-supplier=Digi-Key, ComponentLink4Description=https://datasheet.ciiva.com/2453/pyu-r-int-thick-7-2453478.pdf?src-supplier=Digi-Key, ComponentLink4URL=https://datasheet.ciiva.com/2453/pyu-r-int-thick-7-2453478.pdf?src-supplier=Digi-Key, ComponentLink5Description=https://datasheet.ciiva.com/5558/pyu-rc0402-51-rohs-l-6-r-5558279.pdf?src-supplier=Mouser, ComponentLink5URL=https://datasheet.ciiva.com/5558/pyu-rc0402-51-rohs-l-6-r-5558279.pdf?src-supplier=Mouser, ComponentLink6Description=https://datasheet.ciiva.com/7850/1018594-7850045.pdf?src-supplier=Element14, ComponentLink6URL=https://datasheet.ciiva.com/7850/1018594-7850045.pdf?src-supplier=Element14, ComponentLink7Description=https://datasheet.ciiva.com/7850/1018594-7850044.pdf?src-supplier=Element14, ComponentLink7URL=https://datasheet.ciiva.com/7850/1018594-7850044.pdf?src-supplier=Element14, Construction=Rectangular, Depth=0.5mm, Features="Moisture Resistant", Height=0.016inch, Item Type=Resistor, Lead Free="Lead Free", Length=0.039inch, Manufacturer Part Number=RC0402FR-0756KL, Military Standard=Not, Number of Terminations=2, Packaging="Tape and Reel", Pricing 1="10000=0.001, 50000=0.001, 300000=0.0009, 1000000=0.0009, 3000000=0.0008 (USD)", Reach SVHC Compliant=No, RoHS=Yes, RoHS Compliant=Yes, Series=RC, Stock 1=2610000, Supplier 1="Future Electronics", Technology="THICK FILM", Termination=SMD/SMT, Tolerance=1%, Width=0.02inch, Working Voltage=50V
R5 R12: library part RC0603JR-07100KL, "RES 100K OHM 5% 1/10W 0603", Case Code (Imperial)=0603, Case Code (Metric)=1608, LCSC Part Number=C100048, Manufacturer=Yageo, Max Operating Temperature=155°C, Max Power Dissipation=100mW, Min Operating Temperature=-55°C, Resistance=100kR, Resistance Tolerance=5%, Resistor Type="Thick Film", Supplier Part Number 1=311-100KGRCT-ND, Temperature Coefficient=100ppm/°C, Voltage Rating=50V, Case/Package=0603, Category="Chip SMD Resistors", ComponentLink1Description=https://datasheet.ciiva.com/7746/443971-7746424.pdf?src-supplier=Element14, ComponentLink1URL=https://datasheet.ciiva.com/7746/443971-7746424.pdf?src-supplier=Element14, ComponentLink2Description=https://datasheet.ciiva.com/7983/443971-7983686.pdf?src-supplier=Element14, ComponentLink2URL=https://datasheet.ciiva.com/7983/443971-7983686.pdf?src-supplier=Element14, ComponentLink3Description=https://datasheet.ciiva.com/7746/443971-7746423.pdf?src-supplier=Element14, ComponentLink3URL=https://datasheet.ciiva.com/7746/443971-7746423.pdf?src-supplier=Element14, ComponentLink4Description=https://datasheet.ciiva.com/8887/pyu-rc0603-51-rohs-l-4-8887903.pdf?src-supplier=Avnet, ComponentLink4URL=https://datasheet.ciiva.com/8887/pyu-rc0603-51-rohs-l-4-8887903.pdf?src-supplier=Avnet, Contact Plating=Tin,Matte, Features="Moisture Resistant", Item Type=Resistor, Lead Free="Lead Free", Manufacturer Part Number=RC0603JR-07100KL, Number of Pins=2, Number of Terminations=2, Packaging="Tape and Reel", Power Rating=100mW, Pricing 1="1=0.10000, 10=0.02000, 100=0.00800, 1000=0.00360, 2500=0.00312 (USD)", Radiation Hardening=No, REACH SVHC="No SVHC", RoHS=Yes, RoHS Compliant=Yes, Series=RC, Size Code=0603, Stock 1=1210037, Supplier 1=Digi-Key, Termination=SMD/SMT, Tolerance=5%, Voltage Rating (DC)=50V, Width=0.8mm
R7: library part RC0603JR-07330RL, "RES  SMD 330R 100 mW 0603", Case Code (Imperial)=0603, Case Code (Metric)=1608, LCSC Part Number=C105879, Manufacturer=Yageo, Max Operating Temperature=155°C, Max Power Dissipation=100mW, Min Operating Temperature=-55°C, Package Quantity=5000, Resistance Tolerance=5%, Resistor Type="Thick Film", Supplier Part Number 1=311-330GRCT-ND, Temperature Coefficient=100ppm/°C, Voltage Rating=50V, Case/Package=0603, Category="Chip SMD Resistors", Construction=Rectangular, Depth=0.8mm, Features="Moisture Resistant", Height=0.45mm, Lead Free="Lead Free", Length=1.6mm, Manufacturer Part Number=RC0603JR-07330RL, Military Standard=Not, Number of Pins=2, Number of Terminations=2, Packaging="Tape and Reel", Power Rating=100mW, Pricing 1="1=0.10000, 10=0.02000, 100=0.00800, 1000=0.00360, 2500=0.00312 (USD)", REACH SVHC="No SVHC", Resistance=330R, RoHS=Yes, RoHS Compliant=Yes, Series=RC, Size Code=0603, Stock 1=1074593, Supplier 1=Digi-Key, Termination=SMD/SMT, Tolerance=5%, Voltage Rating (DC)=50V, Width=0.8mm
R15: library part RC0603FR-071KL, "RES SMD 1K OHM 1% 1/10W 0603", Case Code (Imperial)=0603, Case Code (Metric)=1608, LCSC Part Number=C22548, Manufacturer=Yageo, Max Operating Temperature=155°C, Min Operating Temperature=-55°C, Power Rating=100mW, Resistance=1kR, Supplier Part Number 1=311-1.00KHRDKR-ND, Temperature Coefficient=100ppm/°C, Tolerance=1%, Voltage Rating=50V, Case/Package=0603, ComponentLink1Description=https://www.verical.com/server-webapp/html/getDatasheet?partID=409289&src-supplier=Verical, ComponentLink1URL=https://www.verical.com/server-webapp/html/getDatasheet?partID=409289&src-supplier=Verical, ComponentLink2Description=http://documents.rs-components.com/techlib://itc_doclist_GB.htm?stockno=5048928&src-supplier=RSComponents, ComponentLink2URL=http://documents.rs-components.com/techlib://itc_doclist_GB.htm?stockno=5048928&src-supplier=RSComponents, ComponentLink3Description=http://www.yageo.com/documents/recent/PYu-RC0603_51_RoHS_L_4.pdf?src-supplier=Avnet+Europe, ComponentLink3URL=http://www.yageo.com/documents/recent/PYu-RC0603_51_RoHS_L_4.pdf?src-supplier=Avnet+Europe, ComponentLink4Description=http://www.farnell.com/datasheets/2167052.pdf?src-supplier=Element14, ComponentLink4URL=http://www.farnell.com/datasheets/2167052.pdf?src-supplier=Element14, ComponentLink5Description=http://www.farnell.com/datasheets/1868787.pdf?src-supplier=Element14, ComponentLink5URL=http://www.farnell.com/datasheets/1868787.pdf?src-supplier=Element14, ComponentLink6Description=http://www.yageo.com/documents/recent/PYu-RC_Group_51_RoHS_L_2.pdf?src-supplier=Avnet, ComponentLink6URL=http://www.yageo.com/documents/recent/PYu-RC_Group_51_RoHS_L_2.pdf?src-supplier=Avnet, ComponentLink7Description=https://www.verical.com/server-webapp/html/getDatasheet?partID=404327&src-supplier=Verical, ComponentLink7URL=https://www.verical.com/server-webapp/html/getDatasheet?partID=404327&src-supplier=Verical, ComponentLink8Description=http://www.farnell.com/datasheets/443971.pdf?src-supplier=Element14, ComponentLink8URL=http://www.farnell.com/datasheets/443971.pdf?src-supplier=Element14, Composition="Thick Film", Contact Plating=Tin,Matte, Depth=0.8mm, Height=0.45mm, Item Type=Resistor, Lead Free="Lead Free", Length=1.6mm, Manufacturer Part Number=RC0603FR-071KL, Military Standard=Not, Packaging="Tape and Reel", Pricing 1="1=0.1, 10=0.023, 100=0.0094, 1000=0.0042, 2500=0.0037 (USD)", Radiation Hardening=No, REACH SVHC="No SVHC", Stock 1=21472395, Supplier 1=Digi-Key, Termination=SMD/SMT
SW1 SW2: "50mA Brick nogging SPST 100MΩ 1000000 times 250gf@±30gf 12V SMD Tactile Switches ROHS", LCSC Part Number=C83206, Manufacturer="Korean Hroparts Elec", Package=SMD, ComponentLink1Description=LCSC, ComponentLink1URL=https://www.lcsc.com/product-detail/Tactile-Switches_Korean-Hroparts-Elec-K2-6639SP-C4SC-04_C83206.html, Item Type="Tactile Switch", Manufacturer Part Number=K2-6639SP-C4SC-04
SW3: "No NO 50mA 100MΩ 100000 Times 12V 130gf@±30gf Brick nogging SPST SMD Tactile Switches ROHS", LCSC Part Number=C963229, Manufacturer=G-Switch, Package=SMD, ComponentLink1Description=LCSC, ComponentLink1URL=https://www.lcsc.com/product-detail/Tactile-Switches_G-Switch-GT-TC074E-H080-L1_C963229.html, Item Type="Tactile Switch", Manufacturer Part Number=GT-TC074E-H080-L1
SW4: "50mA Lying SPST 24V Plugin Tactile Switches ROHS", Manufacturer="TE Connectivity", Category="Pushbutton Switches", ComponentLink1Description=https://datasheet.ciiva.com/30072/eng-cd-1825027-f-30072833.pdf?src-supplier=Onlinecomponents.com, ComponentLink1URL=https://datasheet.ciiva.com/30072/eng-cd-1825027-f-30072833.pdf?src-supplier=Onlinecomponents.com, ComponentLink2Description=https://datasheet.ciiva.com/16393/1825027-8-16393346.pdf?src-supplier=Future+Electronics, ComponentLink2URL=https://datasheet.ciiva.com/16393/1825027-8-16393346.pdf?src-supplier=Future+Electronics, ComponentLink3Description=https://datasheet.ciiva.com/8164/eng-cd-1825027-g4-8164921.pdf?src-supplier=Avnet, ComponentLink3URL=https://datasheet.ciiva.com/8164/eng-cd-1825027-g4-8164921.pdf?src-supplier=Avnet, Manufacturer Part Number=1825027-8, Pricing 1="1=0.13800, 10=0.13370, 25=0.12590, 100=0.10940, 250=0.10570, 500=0.09520, 1000=0.07320, 2500=0.07250, 5000=0.06250 (USD)", RoHS=Yes, Stock 1=178529, Supplier 1="Arrow Electronics", Supplier Part Number 1=1825027-8
U1: "ESOP-8 Battery Management ICs ROHS", LCSC Part Number=C16581, Manufacturer=TOPPOWER, Package=ESOP-8, ComponentLink1Description=LCSC, ComponentLink1URL=https://www.lcsc.com/product-detail/Battery-Management-ICs_TOPPOWER-Nanjing-Extension-Microelectronics-TP4056-42-ESOP8_C16581.html, Item Type=Mosfet, Manufacturer Part Number=TP4056-42-ESOP8
U2: "RF TXRX MODULE BT PCB TRACE SMD", LCSC Part Number=C5361945, Manufacturer="Espressif Systems", Supplier Part Number=1965-ESP32-WROOM-32E-N8R2DKR-ND, Category=Uncategorized, Item Type=Module, Manufacturer Part Number=ESP32-WROOM-32E-N8R2, Pricing="1=2.88 (USD)", RoHS=No, Supplier=Digikey
U3: "500-MA, LOW-NOISE, LOW-IQ, HIGH", LCSC Part Number=C3019997, Manufacturer="Texas Instruments", Package=Custom, ComponentLink1Description=LCSC, ComponentLink1URL=https://www.lcsc.com/product-detail/Linear-Voltage-Regulators-LDO_Texas-Instruments-TPS7A2133PYWDJ_C3019997.html, Item Type=IC, Manufacturer Part Number=TPS7A2133PYWDJ

## Free pads (board coordinates)
  round 102.36 hole 78.74 mask+1.97: MH(0,0) MH(393.7,2480.32) MH(2755.91,2480.32) MH(3149.61,0)

## Via types
v1: diameter 23.62, hole 11.81, Top Layer to Bottom Layer, 60 vias

## Nets (pads, with @x,y where several pads share a name; then routed paths per layer and width w, separated by ;. In a path a pad name is that pad's centre, name@x,y a point inside that pad or via, vN(x,y) a via of type N, cw(c..) or ccw(c..) an arc to the next point about the centre after c; other vN are vias at no path point)
3.3V: C1.2 C12.2 C13.2 C18.2 J3.1 Q1.1 R4.1 R8.2 R9.1 R10.1 R13.1 U2.2 U3.A2 | length 1194.9
  Top Layer w25: v1(1646,45) 2174.44,45 2223.15,-3.71 v1(2223.15,-130.24) ; v1@2846.46,1051.75 2960.75,1051.75 2996.23,1087.23 v1(2996.23,1146.67)
  Bottom Layer w20: R8.2 v1(2514.17,1977) ; v1@2846.46,1053 R4.1 ; C18.2@2996.37,1112.13 C18.2 2996.23,1112.73 v1(2996.23,1146.67) 2996.23,1208.43 U2.2 ; C1.2@3046.08,1112.13 C1.2
  Bottom Layer w25: R10.1 v1(1646,45)
  other v1: 2869,-227 2901,-227 2846.46,1052.75 2530.72,1075.25 2493.95,2235.25 2529.95,2235.25
5VCC: C10.2 C11.2 C14.2 C15.2 C16.2 C17.2 D3.1 FB1.1 LED4.1 LED5.1 LED6.1 LED7.1 LED8.1 LED9.1 Q2.1 R12.2 R14.1 | length 364.7
  Top Layer w20: v1@2121,842 2125,838 v1(2406,838)
  Bottom Layer w20: v1(2406,838) R14.1
  other v1: 1436.69,444 1536,444 1631,444 1719.99,444 2121,838
5VDC: C6.2 F1.2 FB1.2 R2.2 R3.2 R7.2 U1.4 U1.8
  other v1: 2452,133 1005.15,137.14 1005.15,171.32 2452,197 941.5,205.5 1005.15,205.5 970.47,207.22
5VIN: C3.2 C5.2 D1.2 F1.1 J1.4
  other v1: 656,-125 760.64,-125 656,-50.12 760.64,-50.12
BATT: C2.2 C4.2 C9.2 J2.2 Q2.2 U1.5
BUTTON: C23.2 R10.2 SW4.2 U2.8 | length 2943.2
  Top Layer w20: v1(1558,-25) 1665,-25 1813,-173 2563,-173 2697,-39 v1(2697,953)
  Bottom Layer w20: SW4.2 1436.24,-259.76 1474,-222 1474,-60 1510.75,-23.25 1558,-23.25 1575,-23.25 ; v1(1558,-25) 1582,-25 1582,-35 1577,-40 ; v1@2696.46,953.54 U2.8
CHRG: LED2.2 U1.7 | length 629.3
  Bottom Layer w20: U1.7@2605,539.85 2605,618 2627.25,640.25 3033.19,640.25 3073.53,599.92 LED2.2
DIN: Q1.2 R13.2 U2.10 | length 169.3
  Bottom Layer w20: U2.10 2596.59,1208.53 2596.59,1039.63 R13.2
DIN#: LED4.4 R15.2 | length 1276.4
  Top Layer w20: LED4.4 1450.26,1442.94 v1(1473.17,1456.16)
  Bottom Layer w20: v1(1473.17,1456.16) 1473.17,1289.83 1578,1185 2160.92,1185 2372.72,973.2 2405.8,973.2 R15.2
DOUT1: LED4.2 LED5.4 | length 307.6
  Top Layer w20: LED5.4@1116.83,1082.68 1116.83,1141.38 cw(c1168.62,1141.38) 1132,1178 cw(c1160.2,1149.8) 1160.2,1189.68 1255.03,1189.68 ccw(c1255.03,1289.68) 1325.74,1218.97 LED4.2
DOUT2: LED5.2 LED6.4 | length 254.5
  Top Layer w20: LED5.2@1246.75,885.83 1246.75,671.77 ccw(c1298.29,671.77) LED6.4
DOUT3: LED6.2 LED7.4 | length 271.1
  Top Layer w20: LED6.2 cw(c1497.28,619.72) 1518.28,640.72 1602.75,556.25 ccw(c1673.46,626.96) 1673.46,526.96 1692.14,526.96 ccw(c1692.14,566.62) LED7.4
DOUT4: LED7.2 LED8.4 | length 293.9
  Top Layer w20: LED7.2 1827.9,751.71 cw(c1898.61,681) 1898.61,781 1960.64,781 ccw(c1960.64,866.36) 2021,806 ccw(c1990.91,836.09) 2033.46,836.09 LED8.4
DOUT5: LED8.2 LED9.4 | length 259.7
  Top Layer w20: LED9.4 cw(c1885.67,1328.36) 1903.54,1328.36 LED8.2
EN: C19.2 C20.1 J3.6 R4.2 SW1.3 SW1.4 U2.3 | length 2661.9
  Top Layer w20: v1(1723,2298) 1723,2514 1783.55,2574.55 v1(2140.25,2574.55) 2434.45,2574.55 2946,2063 v1(2946,1337)
  Bottom Layer w20: v1(2140.25,2574.55) J3.6 ; v1(2946,1337) 2946.23,1336.77 2946.23,1208.89 U2.3 C19.2
GND: C1.1 C2.1 C3.1 C4.1 C5.1 C6.1 C7.1 C8.1 C9.1 C10.1 C11.1 C12.1 C13.1 C14.1 C15.1 C16.1 C17.1 C18.1 C19.1 C20.2 C21.1 C22.1 C23.1 D1.1 J1.2 J2.1 J2.MP1 J2.MP2 J3.2 J3.MP1 J3.MP2 LED4.3 LED5.3 LED6.3 LED7.3 LED8.3 LED9.3 pad.MH R1.2 R5.1 R12.1 SW1.1 SW1.2 SW2.1 SW2.2 SW3.1 SW3.2 SW4.1 SW4.3 SW4.4 U1.1 U1.3 U1.9 U2.1 U2.38 U2.39 U2.39_10 U2.39_11 U2.39_12 U2.39_13 U2.39_14 U2.39_15 U2.39_16 U2.39_17 U2.39_18 U2.39_19 U2.39_20 U2.39_21 U2.40 U2.41 U2.42 U2.43 U2.44 U2.45 U2.46 U2.47 U3.B2 | length 1087.4
  Top Layer w20: C14.1@1165.33,814.5 v1(1165.33,839) ; C10.1 cw(c1227.25,1235.68) 1217.3,1253.03 v1(1240.23,1266.27) ; C22.1 1378.94,938.77 cw(c1377.17,938.77) v1(1378.42,937.52) 1379.4,937.52 1391.72,925.2 SW3.2 ; v1@1489.14,560.24 1515.17,545.21 C16.1@1526,538.96 ; C17.1 v1(1662.87,1422.37) ; v1(1906.39,701) C11.1@1938.75,718.75 ; C15.1 v1(1986.48,1113.25)
  Top Layer w25: v1(2390.15,-128.24) v1(2390.15,-45.24)
  Bottom Layer w20: C21.1@1405.36,2280 C21.1 1442,2280 1460,2298 SW2.1 ; SW1.2 1574,2289 1586,2277 C20.2 ; U2.39 2925.08,1448.82 cw(c2925.08,1348.82) 2995.79,1419.53 3017.17,1398.15 cw(c2946.46,1327.44) 3046.46,1327.44 U2.1
  other v1: 203,-289 276.88,-289 354,-289 203,-220.6 354,-220.6 801,21.25 2530.95,395.25 2628.95,395.25 2579.95,423.05 2530.95,452.25 2628.95,452.25 1488.97,560.89 1986,880 1782.95,954.65 1517,2100 1517,2276
IO0: C21.2 J3.5 R8.1 SW2.3 SW2.4 U2.25 | length 2858.5
  Bottom Layer w20: 1314.47,2283 1177.5,2283 1134.95,2240.45 1134.95,1743.05 1182.69,1695.31 2013.31,1695.31 2215.64,1897.64 U2.25 2396.73,1897.91 2396.73,1976.73 R8.1 2397,2030 2381,2046 2302,2046 2214.9,2133.1 J3.5
IOT_BUT: C22.2 R9.2 SW3.3 SW3.4 U2.11 | length 1479.7
  Top Layer w25: SW3.4 SW3.3 v1@1707.68,1218
  Bottom Layer w20: v1(1707,1218) 2184,1218 2362.75,1039.25 R9.2 2429.47,1085.92 cw(c2479.08,1085.92) 2444,1121 2451.03,1128.03 cw(c2492,1087.06) 2492,1145 2502.79,1145 ccw(c2502.79,1196.21) 2539,1160 ccw(c2521,1178) 2546.46,1178 U2.11
ISET: R1.1 U1.2 | length 80.6
  Bottom Layer w20: R1.1 U1.2
JACK_DET: R3.1 R5.2 U2.9 | length 2429.5
  Top Layer w20: v1(886.5,259.25) 2169.25,259.25 2647,737 v1(2647,953)
  Bottom Layer w20: v1(2647,953) U2.9@2647,1208.12
NetLED1_1: LED1.1 R2.1 | length 55.7
  Bottom Layer w20: R2.1 3014.32,468.25 3014.47,468.09 LED1.1
NetLED2_1: LED2.1 R7.1 | length 55.5
  Bottom Layer w20: R7.1 LED2.1
NetQ1_3: Q1.3 R14.2 R15.1
NetR6_1: R6.1 U3.B1
RXD: J3.4 U2.34 | length 1211
  Bottom Layer w15: J3.4 2254.27,2155.73 2310,2100 2803.05,2100 2846.46,2056.6 U2.34
STDBY: LED1.2 U1.6 | length 1059
  Bottom Layer w20: U1.6@2555,530.82 2555,633 2598.25,676.25 3086.75,676.25 3150.1,612.9 3150.1,427.99 3131.41,409.31 3091.13,409.31 3073.53,426.91 LED1.2
TXD: J3.3 U2.35 | length 1217.7
  Bottom Layer w15: J3.3 2293.64,2172.36 2328,2138 2825,2138 2896.46,2066.54 U2.35
VIN: C7.2 C8.2 D3.2 Q2.3 R6.2 U3.A1
pads on no net: J1.3 J1.MH LED9.2 U2.4 U2.5 U2.6 U2.7 U2.12 U2.13 U2.14 U2.15 U2.16 U2.17 U2.18 U2.19 U2.20 U2.21 U2.22 U2.23 U2.24 U2.26 U2.27 U2.28 U2.29 U2.30 U2.31 U2.32 U2.33 U2.36 U2.37

## Polygon pours and split planes (outlines as drawn)
GND on Bottom Layer "NONET_L02_P-001" (solid, remove dead copper, pour order 0): -172.03,1915.69 -172.03,25.92 -144.8,-19.17 -114.03,-67.64 -67.37,-131.4 -8.7,-201.53 89.08,-300.48 153.35,-356.33 207.97,-396.23 255.63,-429.22 308.15,-464.1 2841.34,-456.23 2987.97,-356.23 3141.97,-216.23 3277.97,-46.23 3317.97,25.92 3317.97,1359.25 3137.97,1359.25 3137.97,1930 3310.59,1930 3267.97,2023.77 3235.48,2083.33 3107.17,2281.33 3017.39,2386.21 2938.52,2460.51 2774.27,2586.57 2667.97,2643.77 2537.97,2703.77 2361.55,2753.77 793.19,2753.77 714.48,2736.62 573.09,2687.06 389.08,2587.77 286.7,2516.71 199.68,2444.25 134.95,2377.73 21.66,2234.7 -44.55,2142.71
GND on Top Layer "NONET_L02_P-001" (solid, remove dead copper, pour order 1): -172.03,1915.69 -172.03,25.92 -144.8,-19.17 -114.03,-67.64 -67.37,-131.4 -8.7,-201.53 89.08,-300.48 153.35,-356.33 207.97,-396.23 255.63,-429.22 308.15,-464.1 2843.29,-456.23 2976.45,-365.41 3145.76,-211.49 3277.97,-46.23 3317.97,25.92 3317.97,1359.25 3128.95,1359.25 3128.95,1930 3310.59,1930 3267.97,2023.77 3205.53,2138.24 3130.34,2254.26 3017.39,2386.21 2938.52,2460.51 2774.27,2586.57 2667.97,2643.77 2537.97,2703.77 2361.55,2753.77 790.8,2753.77 724.87,2739.4 564.37,2683.15 394.2,2591.33 286.7,2516.71 199.68,2444.25 134.95,2377.73 21.66,2234.7 -44.55,2142.71

## Other copper
Top Layer:
  rectangle net 3.3V: 2846,-248.31 2918,1072
  rectangle net 3.3V: 2477,1033 2918,1072
  rectangle net 3.3V: 2477,1033 2554,2252
  region net 5VCC: 2092.94,479.5 1964.33,702.26 1855.25,639.28 1983.86,416.52
  region net 5VCC: 1185.34,1266.27 1299.61,1332.24 1148.98,1593.13 1034.72,1527.16
  region net 5VCC: 1629.94,1473.21 1744.21,1407.24 1807,1516 1692.74,1581.97
  rectangle net 5VIN: 610,-147 773,-19
  rectangle net IOT_BUT: 1366.45,1027.56 1466.54,1059.06
  rectangle net IOT_BUT: 1366.45,1003.75 1391.45,1059.06
  rectangle net 5VDC: 923.14,112 2521,221.83
  rectangle net 5VCC: 953,794.5 1137.83,915.35
  region net 5VCC: 2173,484 951,484 951,405.75 2173,405.75
  rectangle net 5VCC: 949.05,406 1053,1595
  rectangle net 5VCC: 951,1516 2173.61,1595
  rectangle net 5VCC: 2077.11,408.25 2173.61,1595
  region net 5VCC: 2173.61,1181.5 2013.78,1181.5 2013.78,1053.15 2173.61,1053.15
  region net 5VCC: 1470.64,414.67 1523.83,506.8 1416.59,568.71 1363.41,476.59
Bottom Layer:
  region net NetR6_1: 2449,-92.99 2449,-70.33 2388.61,-70.33 2388.61,-92.99
  region net NetR6_1: 2447.18,-81.11 2447.18,-68.19 2346.42,-68.19 2346.42,-81.11
  region net VIN: 2339.45,60.49 2295.36,60.49 2295.36,-24.01 2339.45,-24.01
  region net VIN: 2453.96,33.15 2453.96,60.51 2313.74,60.51 2313.74,33.15
  rectangle net VIN: 2416.15,-33.24 2453.96,51.26
  rectangle net GND: 2353.11,-59.5 2407.11,23.84
  region net GND: 2408,-105 2370.2,-105 2370.2,-189.5 2408,-189.5